# Altium PCB Custom_Keyboard.PcbDoc (part 2 of 3)
Units mil, origin at the board's own origin, x right, y up, seen from the top; angles counter-clockwise.
Board outline 3302 x 1991 mil, 2 copper layers (Top Layer, Bottom Layer), stack 57 mil thick; 188 components, 152 nets, 718 pads, 297 vias.
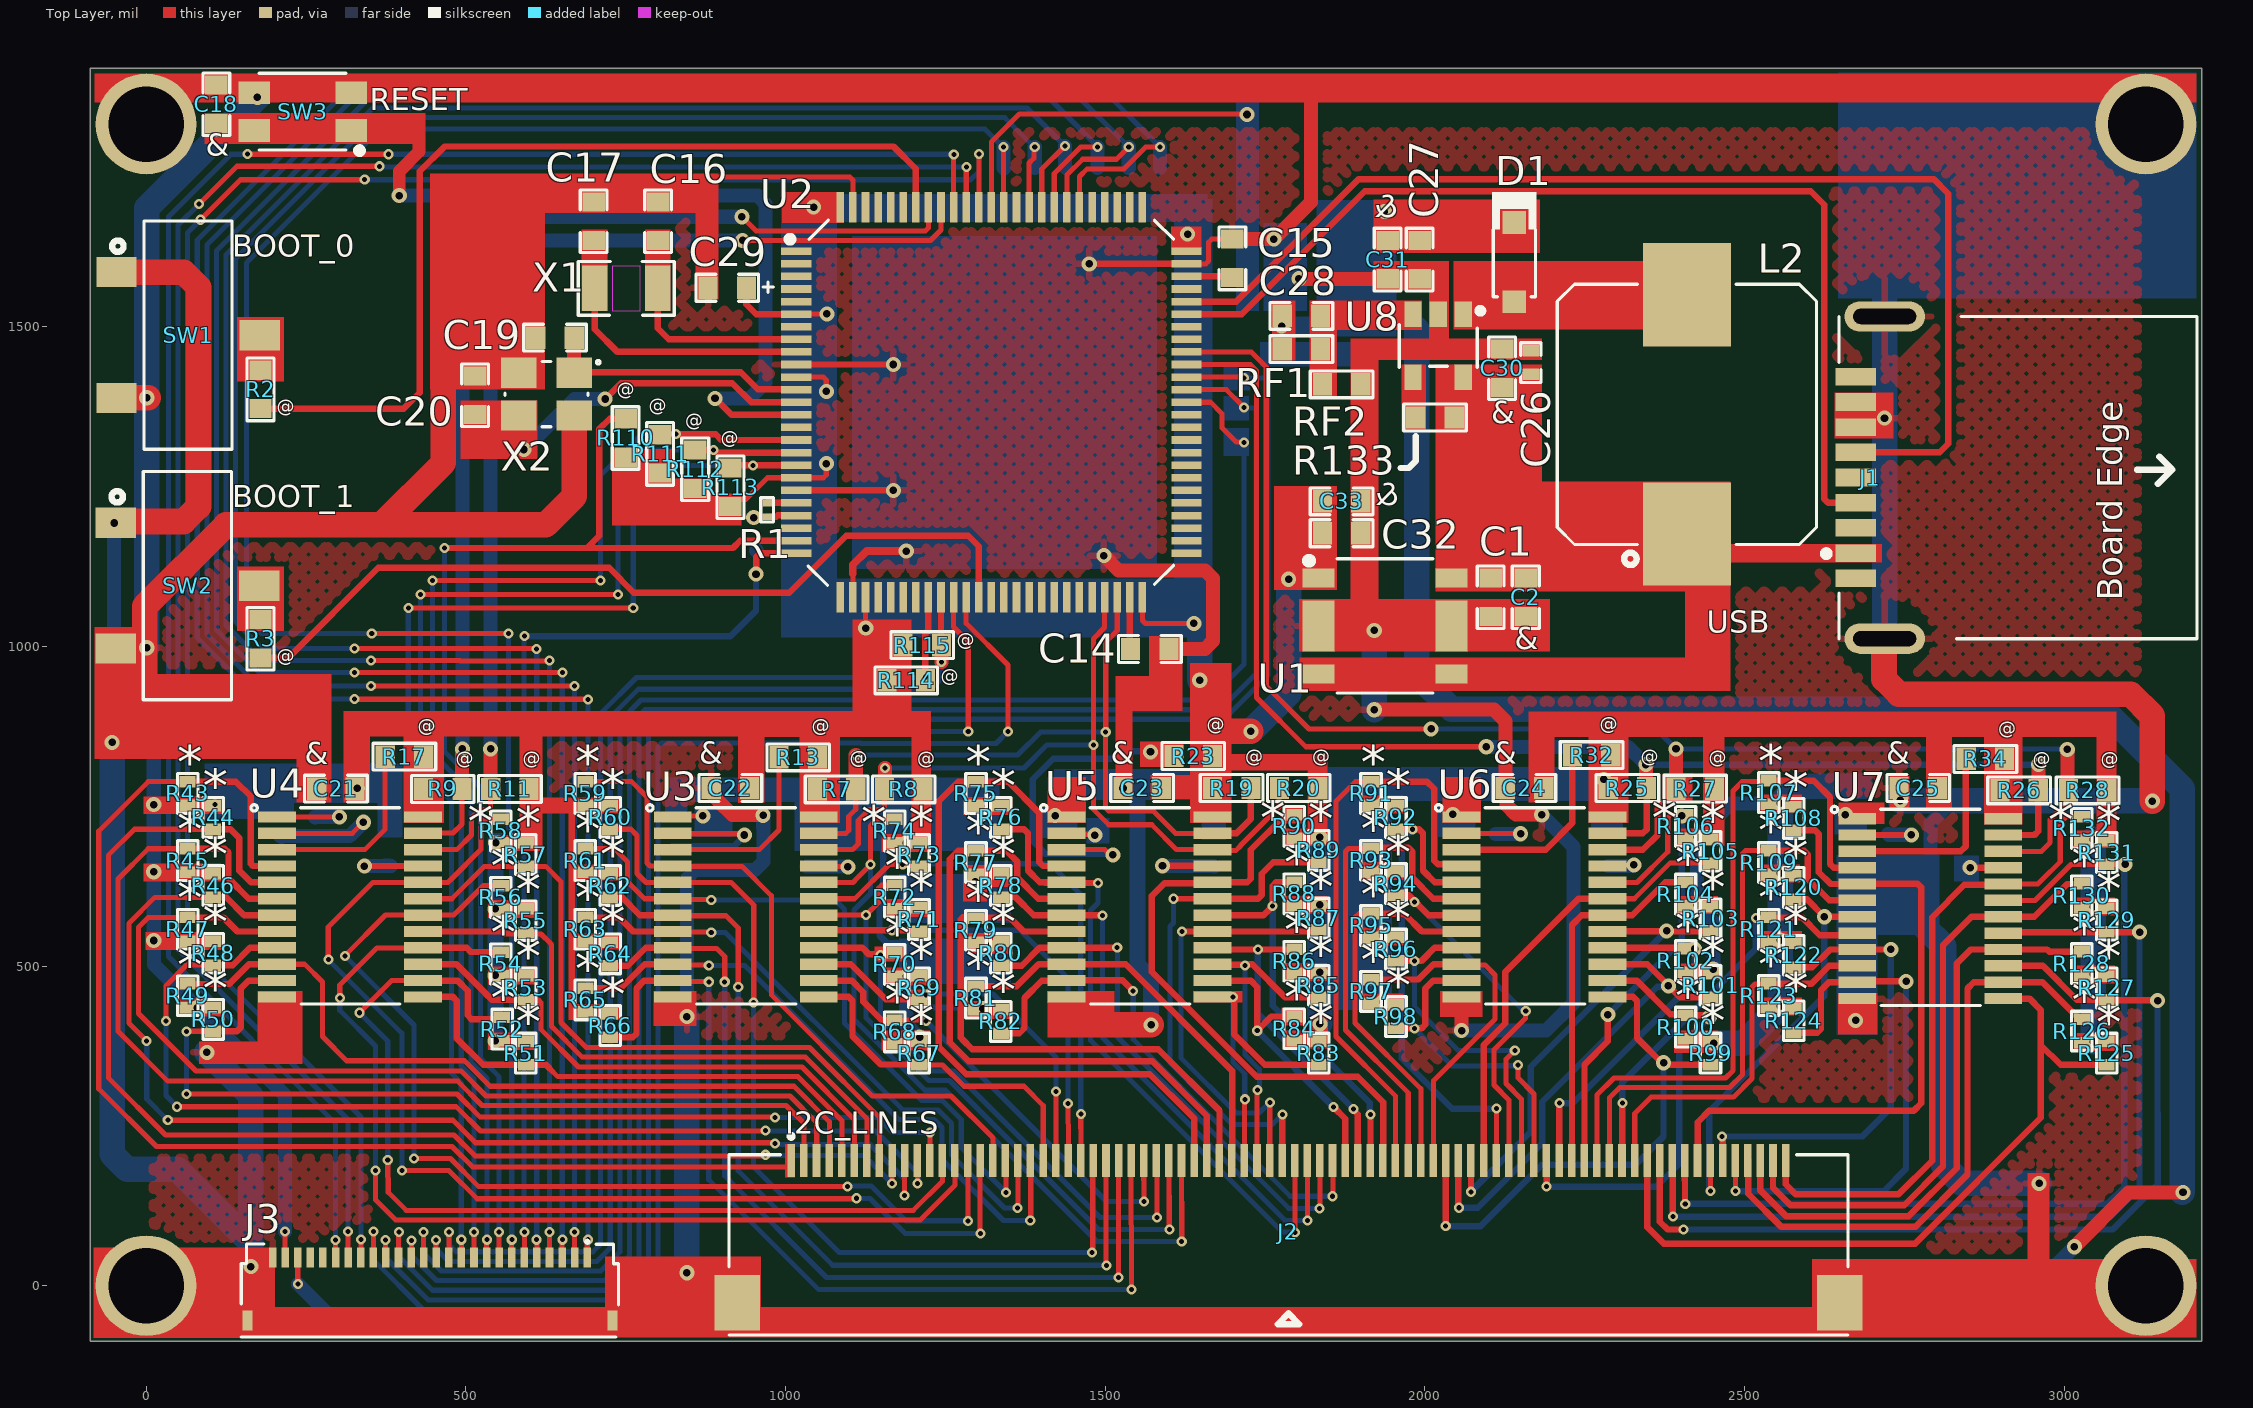
[diagram p0: Top Layer view]

## Part data (continued)
R133: library part RMCF0603FT51K0, "Res Thick Film 0603 51K Ohm 1% 0.1W(1/10W) ±100ppm/C Pad SMD Automotive T/R", Case Code (Imperial)=0603, Case Code (Metric)=1608, Manufacturer="Stackpole Electronics", Max Operating Temperature=155°C, Max Power Dissipation=100mW, Min Operating Temperature=-55°C, Resistance=51kR, Resistor Type="Thick Film", Supplier Part Number 1=RMCF0603FT51K0CT-ND, Temperature Coefficient=100ppm/°C, Tolerance=1%, Case/Package=0603, Category="Chip SMD Resistors", ComponentLink1Description=http://components.arrow.com/part/dataview/40961090S7167716N1174?src-supplier=Arrow+Electronics, ComponentLink1URL=http://components.arrow.com/part/dataview/40961090S7167716N1174?src-supplier=Arrow+Electronics, ComponentLink2Description=https://www.seielect.com/catalog/SEI-RMCF_RMCP.pdf?src-supplier=Avnet, ComponentLink2URL=https://www.seielect.com/catalog/SEI-RMCF_RMCP.pdf?src-supplier=Avnet, ComponentLink3Description=https://www.seielect.com/catalog/SEI-Packaging.pdf?src-supplier=Digi-Key, ComponentLink3URL=https://www.seielect.com/catalog/SEI-Packaging.pdf?src-supplier=Digi-Key, Contact Plating=Tin,Matte, Features="Automotive AEC-Q200", Height=0.022inch, Length=0.061inch, Manufacturer Part Number=RMCF0603FT51K0, Mount="Surface Mount", Number of Terminations=2, Packaging="Tape and Reel", Pricing 1="1=0.10000, 10=0.01700, 100=0.00680, 1000=0.00305, 2500=0.00264 (USD)", Radiation Hardening=No, RoHS=Yes, RoHS Compliant=Yes, Series=RMCF, Stock 1=628549, Supplier 1=Digi-Key, Width=0.031inch
RF1: library part RC0603FR-0768KL, "RES SMD 68K OHM 1% 1/10W 0603", Case Code (Imperial)=0603, Case Code (Metric)=1608, Manufacturer=Yageo, Max Operating Temperature=155°C, Max Power Dissipation=100mW, Min Operating Temperature=-55°C, Package Quantity=1, Resistance=68kR, Supplier Part Number 1=311-68.0KHRCT-ND, Temperature Coefficient=100ppm/°C, Tolerance=1%, Voltage Rating=50V, Case/Package=0603, ComponentLink1Description=http://www.yageo.com/documents/recent/PYu-RC_Group_51_RoHS_L_10.pdf?src-supplier=Digi-Key, ComponentLink1URL=http://www.yageo.com/documents/recent/PYu-RC_Group_51_RoHS_L_10.pdf?src-supplier=Digi-Key, ComponentLink2Description=http://documents.rs-components.com/techlib://itc_doclist_GB.htm?stockno=5048243&src-supplier=RSComponents, ComponentLink2URL=http://documents.rs-components.com/techlib://itc_doclist_GB.htm?stockno=5048243&src-supplier=RSComponents, ComponentLink3Description=http://www.yageo.com/documents/recent/PYu-RC_Group_51_RoHS_L_9.pdf?src-supplier=Digi-Key, ComponentLink3URL=http://www.yageo.com/documents/recent/PYu-RC_Group_51_RoHS_L_9.pdf?src-supplier=Digi-Key, ComponentLink4Description=http://www.farnell.com/datasheets/1868787.pdf?src-supplier=Element14, ComponentLink4URL=http://www.farnell.com/datasheets/1868787.pdf?src-supplier=Element14, ComponentLink5Description=http://www.farnell.com/datasheets/443971.pdf?src-supplier=Element14, ComponentLink5URL=http://www.farnell.com/datasheets/443971.pdf?src-supplier=Element14, ComponentLink6Description=http://www.farnell.com/datasheets/2167052.pdf?src-supplier=Element14, ComponentLink6URL=http://www.farnell.com/datasheets/2167052.pdf?src-supplier=Element14, Composition="Thick Film", Depth=0.8mm, Features="Moisture Resistant", Height=0.022inch, Lead Free="Lead Free", Length=0.063inch, Manufacturer Part Number=RC0603FR-0768KL, Number of Pins=2, Number of Terminations=2, Packaging="Tape and Reel", Power Rating=100mW, Pricing 1="1=0.1, 10=0.023, 100=0.0094, 1000=0.00421, 2500=0.00366 (USD)", REACH SVHC=Unknown, Stock 1=3330967, Supplier 1=Digi-Key, Termination=SMD/SMT, Voltage Rating (DC)=50V, Width=0.031inch
RF2: library part AC0603FR-0713K3L, "RES SMD 13.3K OHM 1% 1/10W 0603", Case/Package=0603, Manufacturer=Yageo, Max Operating Temperature=155°C, Max Power Dissipation=100mW, Min Operating Temperature=-55°C, Resistance=13.3kR, Resistor Type="Thick Film", Supplier Part Number 1=13-AC0603FR-0713K3LCT-ND, Temperature Coefficient=100ppm/°C, Tolerance=1%, Category="Chip SMD Resistors", ComponentLink1Description=http://www.yageo.com/NewPortal/yageodocoutput?fileName=/pdf/R-Chip/PYu-AC_51_RoHS_L_6.pdf&src-supplier=Digi-Key, ComponentLink1URL=http://www.yageo.com/NewPortal/yageodocoutput?fileName=/pdf/R-Chip/PYu-AC_51_RoHS_L_6.pdf&src-supplier=Digi-Key, Features="Moisture Resistant,Automotive AEC-Q200", Height=0.022inch, Length=0.063inch, Manufacturer Part Number=AC0603FR-0713K3L, Number of Terminations=2, Packaging="Tape and Reel", Pricing 1="1=0.10000, 10=0.02900, 100=0.01170, 1000=0.00527, 2500=0.00458 (USD)", RoHS=Yes, RoHS Compliant=Yes, Stock 1=500, Supplier 1=Digi-Key, Width=0.031inch
SW1 SW2: "SPDT 50mA @ 12VDC 12V On-On SMD Toggle Switches RoHS", Contact Rating @ Voltage="50mA @ 12VDC", Manufacturer="XKB Connectivity", Operating Force=200±100gf, Package=SMD, Rated Voltage(DC)=12V, Actuator Orientation=Vertical, Actuator Type=Standard, Circuit=SPDT, Contact Finish=Silver, Contact Material=Brass, Electrical Life Cycles=10000, Mounting Type="Surface Mount", Switch Height=3mm
SW3: "3mm 2mm Round Button 50mA Top3.65mm SPST 12V SMD Tactile Switches", Manufacturer=XKB, Package=Custom, ComponentLink1Description=LCSC, ComponentLink1URL=https://lcsc.com/product-detail/Tactile-Switches_XKB-Connectivity-TS-1185EC-C-D-B_C318893.html, Manufacturer Part No=TS-1185EC-C-D-B
U1: "IC REG LINEAR 3.3V 1A 6HSOP", Manufacturer=ABLIC, Supplier Part Number 1=1662-1407-1-ND, Category="Voltage Regulators - Linear", Manufacturer Part Number=S-1172B33-E6T1U, Pricing 1="1=1.61000, 10=1.43800, 25=1.36520, 100=1.12150, 250=1.04832, 500=0.92644, 1000=0.73140 (USD)", RoHS=Yes, RoHS Compliant=Yes, Stock 1=7813, Supplier 1=Digi-Key
U2: "IC MCU 32BIT 1MB FLASH 100LQFP", Case/Package=LQFP, Frequency=168MHz, Manufacturer=STMicroelectronics, Max Operating Temperature=105°C, Max Power Dissipation=465mW, Min Operating Temperature=-40°C, Category=Microcontrollers, ComponentLink1Description=https://datasheet.ciiva.com/48494/dm00037051-48494023.pdf?src-supplier=Avnet, ComponentLink1URL=https://datasheet.ciiva.com/48494/dm00037051-48494023.pdf?src-supplier=Avnet, Core Architecture=ARM, Data Bus Width=32b, Interface=I2C,SPI,USB,CAN,Ethernet,IrDA,UART,USART,LIN,EBI/EMI,I2S, Manufacturer Part Number=STM32F407VGT7TR, Max Frequency=168MHz, Memory Size=1MB, Memory Type=FLASH, Number of I/Os=82, Number of Pins=100, Number of Programmable I/O=82, Number of Timers/Counters=14, Oscillator Type=Internal, Packaging="Tape and Reel", Peripherals="Brown-out Detect/Reset,POR,PWM,WDT,DMA,LCD", Pricing 1="1000=8.54203, 2000=8.32301, 4000=8.19785, 6000=8.07269, 8000=7.97882, 10000=7.82238, 100000=7.69722 (USD)", Radiation Hardening=No, RAM Size=196KB, RoHS=Yes, RoHS Compliant=Yes, Supplier 1=Avnet, Supplier Part Number 1=STM32F407VGT7TR, Watchdog Timer=Yes
U3 U4 U5 U6 U7: "IC BUS SWITCH 1 X 8:1 24TSSOP", Case/Package=TSSOP, Manufacturer="Texas Instruments", Max Operating Temperature=85°C, Max Supply Current=80uA, Max Supply Voltage=5.5V, Min Operating Temperature=-40°C, Min Supply Voltage=1.65V, On-State Resistance=70R, Package Quantity=1, Supplier Part Number 1=296-34905-1-ND, Category="Decoders and Multiplexers", ComponentLink1Description=https://datasheet.ciiva.com/6614/tca9548a-6614721.pdf?src-supplier=Digi-Key, ComponentLink1URL=https://datasheet.ciiva.com/6614/tca9548a-6614721.pdf?src-supplier=Digi-Key, Contact Plating=Gold, Independent Circuits=1, Lead Free="Lead Free", Manufacturer Part Number=TCA9548APWR, Mount="Surface Mount", Number of Pins=24, Packaging="Tape and Reel", Pricing 1="1=2.09000, 10=1.87600, 25=1.77040, 100=1.50820, 250=1.41616, 500=1.23914, 1000=1.16900 (USD)", REACH SVHC="No SVHC", RoHS=Yes, Supplier 1=Digi-Key, Supply Type=Single
U8: "IC REG BOOST ADJ 0.8A SOT23-5", Case/Package=SOT-23-5, Manufacturer="TI National Semiconductor", Max Input Voltage=14V, Max Operating Temperature=125°C, Max Output Current=800mA, Max Output Voltage=28V, Min Input Voltage=2.7V, Min Operating Temperature=-40°C, Min Output Voltage=4V, Output Power=2.5W, Package Quantity=1, Quiescent Current=2.1mA, Supplier Part Number 1=926-LM27313XMF/NOPB, Switching Frequency=1.6MHz, Category="Voltage Regulators - Switching", ComponentLink1Description=https://datasheet.ciiva.com/22669/1775263-22669473.pdf?src-supplier=Element14, ComponentLink1URL=https://datasheet.ciiva.com/22669/1775263-22669473.pdf?src-supplier=Element14, ComponentLink2Description=https://datasheet.ciiva.com/27056/2038467-27056413.pdf?src-supplier=Jameco, ComponentLink2URL=https://datasheet.ciiva.com/27056/2038467-27056413.pdf?src-supplier=Jameco, ComponentLink3Description=https://datasheet.ciiva.com/23605/37176-23605316.pdf?src-supplier=Newark, ComponentLink3URL=https://datasheet.ciiva.com/23605/37176-23605316.pdf?src-supplier=Newark, ComponentLink4Description=https://datasheet.ciiva.com/25627/0900766b810fa43d-25627220.pdf?src-supplier=RSComponents, ComponentLink4URL=https://datasheet.ciiva.com/25627/0900766b810fa43d-25627220.pdf?src-supplier=RSComponents, ComponentLink5Description=https://datasheet.ciiva.com/15113/getdatasheetpartid-203533-15113382.pdf?src-supplier=Verical, ComponentLink5URL=https://datasheet.ciiva.com/15113/getdatasheetpartid-203533-15113382.pdf?src-supplier=Verical, ComponentLink6Description=https://datasheet.ciiva.com/3220/lm27313-q1-3220064.pdf?src-supplier=Avnet, ComponentLink6URL=https://datasheet.ciiva.com/3220/lm27313-q1-3220064.pdf?src-supplier=Avnet, ComponentLink7Description=https://datasheet.ciiva.com/6603/lm27313-6603792.pdf?src-supplier=Digi-Key, ComponentLink7URL=https://datasheet.ciiva.com/6603/lm27313-6603792.pdf?src-supplier=Digi-Key, ComponentLink8Description=https://datasheet.ciiva.com/6603/lm27313-6603791.pdf?src-supplier=Digi-Key, ComponentLink8URL=https://datasheet.ciiva.com/6603/lm27313-6603791.pdf?src-supplier=Digi-Key, ComponentLink9Description=https://datasheet.ciiva.com/6603/lm27313-6603788.pdf?src-supplier=Digi-Key, ComponentLink9URL=https://datasheet.ciiva.com/6603/lm27313-6603788.pdf?src-supplier=Digi-Key, Contact Plating=Tin, Efficiency=80%, Height=1.02mm, Lead Free="Lead Free", Length=2.92mm, Manufacturer Part Number=LM27313XMF/NOPB, Mount="Surface Mount", Number of Outputs=1, Number of Pins=5, Output Configuration=Positive, Output Current=800mA, Output Type=Adjustable, Output Voltage=28V, Packaging="Tape and Reel", Pricing 1="1=2.17000, 10=1.96000, 25=1.85000, 50=1.85000, 100=1.58000, 250=1.48000, 500=1.30000, 1000=1.07000, 10000=1.07000 (USD)", Radiation Hardening=No, REACH SVHC="No SVHC", RoHS=Yes, RoHS Compliant=Yes, Series=LM27313, Supplier 1=Mouser, Synchronous Rectifier=No, Topology=Boost, Width=1.6mm
X1: library part Q13FC1350000200, "32.768kHz SMD Crystal Resonator 7pF 70kΩ ±20ppm", Equivalent Series Resistance (ESR)=70kΩ, Frequency=32.768kHz, Load Capacitance=7pF, Manufacturer="Seiko Epson", Crystal Type="SMD Crystal Resonator"
X2: library part S3225000101040, "25MHz SMD Crystal Resonator 10pF 40Ω ±10ppm", Equivalent Series Resistance (ESR)=40Ω, Load Capacitance=10pF, Manufacturer=JGHC, Crystal Type="SMD Crystal Resonator", Frequency=25MHz

## Free pads (board coordinates)
  round 157.48 hole 118.11: MH1(0,0) MH2(3128,0) MH3(3128,1817) MH4(0,1817)

## Via types
v1: diameter 15.75, hole 7.87, Top Layer to Bottom Layer, tented both sides, 170 vias
v2: diameter 23.62, hole 11.81, Top Layer to Bottom Layer, tented both sides, 127 vias

## Nets (pads, with @x,y where several pads share a name; then routed paths per layer and width w, separated by ;. In a path a pad name is that pad's centre, name@x,y a point inside that pad or via, vN(x,y) a via of type N, cw(c..) or ccw(c..) an arc to the next point about the centre after c; other vN are vias at no path point)
BOOT0: R2.1 U2.94 | length 1472
  Top Layer w10: R2.1@179,1372 403,1372 428,1397 428,1743 467,1782 1169,1782 1204,1747 U2.94@1204,1687
BOOT1: R3.1 U2.37 | length 1321.2
  Top Layer w10: R3.1@179,982 222.14,982 363.02,1122.87 724.23,1122.87 762.92,1084.19 1006.19,1084.19 1095,1173 1286,1173 1302.43,1156.57 U2.37@1302.43,1076.76
COl_1: J3.1 R6.1 U2.81 | length 4026.7
  Top Layer w8: v1(326,918) 326.57,917.43 690.43,917.43 v1(691,916.85) ; J3.1@689.96,44.11 689.96,70.96 v1(691,72) ; U2.81@1459.91,1687 1459.91,1734.91 1472,1747 1529.69,1747 1563.69,1781 v1(1586,1781)
  Bottom Layer w8: v1(326,918) 175,918 80,1013 80,1635.56 331.44,1887 1480,1887 v1(1586,1781) ; v1(691,72) v1(691,916.85)
  Bottom Layer w22: R6.1@1586,1748 v1(1586,1781)
COl_2: J3.2 R37.1 U2.82 | length 3891.5
  Top Layer w8: v1(352,938) 668.39,938 669.39,937 v1(670.39,938) ; J3.2@670.39,44 v1(670.39,84.13) ; U2.82@1440.22,1687 1440.22,1737.22 1465,1762 1518,1762 v1(1537,1781)
  Bottom Layer w8: v1(352,938) 176.21,938 95,1019.21 95,1628 339,1872 1446,1872 v1(1537,1781) ; v1(670.39,84.13) v1(670.39,938)
  Bottom Layer w22: R37.1@1537,1748 v1(1537,1781)
COl_3: J3.3 R38.1 U2.83 | length 3756.9
  Top Layer w8: v1(326,959) 649,959 650.5,957.5 v1@651,958 ; J3.3@650.59,44.11 650.59,71.59 v1(651,72) ; U2.83@1420.54,1687 1420.54,1739.54 1462,1781 v1(1488,1781)
  Bottom Layer w8: v1(326,959) 177,959 110,1026 110,1619 348,1857 1413,1857 v1@1489,1781 ; v1(651,72) v1(651,959)
  Bottom Layer w22: R38.1@1488,1748 v1(1488,1781)
COl_4: J3.4 R39.1 U2.84 | length 3621.5
  Top Layer w8: v1(352,978) 491.06,978 491.81,977.25 628.63,977.25 v1@629.37,978 ; J3.4@631.02,44 v1(631.02,84.13) ; U2.84@1400.9,1685.28 1400.9,1746.59 v1(1437.15,1782.85)
  Bottom Layer w8: v1(352,978) 179.57,978 125,1032.57 125,1612.64 354.36,1842 1378,1842 v1(1437.15,1782.85) ; v1(631.02,84.13) v1@631.01,978
  Bottom Layer w22: v1(1437.15,1782.85) 1437.15,1749.85 R39.1@1439,1748
  other v1: 630.87,978
COl_5: J3.5 R40.1 U2.85 | length 3498.9
  Top Layer w8: v1(326,997) 326.13,996.87 610.25,996.87 v1(611,996.13) ; v1(611,72) 611.22,71.78 J3.5@611.22,44.11 ; U2.85@1381.17,1687 1381.17,1756.13 1388.52,1763.48 1388.52,1778.52 v1@1390,1780
  Bottom Layer w8: v1(326,997) 181.79,997 140,1038.79 140,1606.43 360.57,1827 1343,1827 v1@1390,1780 ; v1(611,72) v1(611,996.13)
  Bottom Layer w22: R40.1@1390,1748 v1(1390,1781)
COl_6: J3.6 R41.1 U2.25 | length 1540.6
  Top Layer w8: v1@589,1016 590,1017 v1@591,1016 ; J3.6@591.65,44 v1(591.65,84.13)
  Top Layer w10: v2@954.14,1113.14 954.14,1139.8 960,1145.66 U2.25@1016.99,1145.66
  Bottom Layer w8: v1@591.32,1015.68 591.32,84.45 v1(591.65,84.13)
  Bottom Layer w10: v1(592,1016) 914,1016 954,1056 v2(954,1113) ; v2@954.31,1113.31 R41.1@954.31,1150.31
  Bottom Layer w22: v2(954,1113) v2@954.31,1113.31 ; R41.1@954.31,1150.31 R41.1@955,1151
COl_7: J3.7 R42.1 U2.87 | length 3365.7
  Top Layer w8: v1(353,1020) v1(567,1020) ; J3.7@571.85,44.11 571.85,71.85 v1(572,72) ; v1(1341,1781) 1341.4,1780.6 1341.4,1687.4 U2.87@1341.8,1687
  Bottom Layer w8: v1(353,1020) 180,1020 157,1043 157,1600 366,1809 1312.31,1809 1340.31,1781 v1(1341,1781) ; v1(567,1020) 567,715.56 572,710.56 v1(572,72) ; R42.1@1341,1747 R42.1@1341.8,1747.8
  Bottom Layer w22: v1(1341,1781) 1341,1748.59 R42.1@1341.8,1747.8
COl_8: J3.8 R110.1 U2.24 | length 1947.8
  Top Layer w8: J3.8@552.28,44 v1(552.28,84.13)
  Top Layer w10: v1(467,1154) 690,1154 ; R110.1@750,1356 725,1356 709,1340 709,1173 690,1154 ; R110.1@761,1354 761,1358.19 R110.1@762.5,1359.69 ; U2.24@1016.99,1165.35 929.35,1165.35 918,1154 690,1154
  Bottom Layer w8: v1(467,1154) 467,835.21 523,779.21 523,356 552.28,326.72 v1(552.28,84.13)
COl_9: J3.9 R111.1 U2.16 | length 1873.4
  Top Layer w8: v1(448,1103) v1(711,1103) ; J3.9@532.48,44.11 532.48,71.48 v1(533,72)
  Top Layer w10: R111.1@814,1332 v1(829,1332) 890.94,1332 900.11,1322.83 U2.16@1016.99,1322.83
  Bottom Layer w8: v1(448,1103) 448,833 508,773 508,349.79 533,324.79 v1(533,72) ; v1(711,1103) 711,1267.61 775.39,1332 v1(829,1332)
COl_10: J3.10 R112.1 U2.17 | length 1888.3
  Top Layer w8: v1(429,1081) v1(738,1081) ; J3.10@512.91,44 v1(512.91,84.13)
  Top Layer w10: R112.1@864,1307 v1(887.83,1307) 889.39,1307 893.25,1303.14 U2.17@1016.99,1303.14
  Bottom Layer w8: v1(429,1081) 429,828 493,764 493,343.57 512.91,323.67 v1(512.91,84.13) ; v1(738,1081) 738,1268 777,1307 v1(887.83,1307)
COl_11: J3.11 R113.1 U2.18 | length 1904.8
  Top Layer w8: v1(410.13,1060) v1(762,1060) ; v1(493,72) 493.11,71.89 493.11,44.11 J3.11@493.22,44
  Top Layer w10: R113.1@914,1279 918.46,1283.46 U2.18@1016.99,1283.46
  Bottom Layer w8: 410.13,824.87 v1(410.13,1060) v1@411,1059.13 ; 411,824 478,757 478,332 493,317 v1(493,72) ; v1(762,1060) 762,1262 783,1283 v1(949,1283)
COl_12: J3.12 R114.1 U2.33 | length 1794.9
  Top Layer w8: J3.12@473.54,44 v1(473.54,84.13)
  Top Layer w10: R114.1@1219,956.87 1219,1020.81 1223.69,1025.5 U2.33@1223.69,1076.76
  Top Layer w22: R114.1@1219,947 v1(1219,951.87)
  Bottom Layer w8: v1(473.54,84.13) 474.13,83.54 474.13,64.18 485.18,53.13 698.82,53.13 711,65.31 711,895.28 767.16,951.44 1218.56,951.44 v1(1219,951.87)
COl_13: J3.13 R115.1 U2.34 | length 1831.3
  Top Layer w8: v1(453.43,71.57) 453.43,44.43 J3.13@453.85,44
  Top Layer w10: U2.34@1243.37,1076.76 1243.37,1002.63 R115.1@1244,1002
  Top Layer w22: R115.1@1244,1002 1244.09,1001.91 v1(1244.09,975.43)
  Bottom Layer w8: v1(453.43,71.57) 453.43,58 473.3,38.13 705.03,38.13 726,59.09 726,889.07 769.93,933 1227.25,933 1244.09,949.83 v1(1244.09,975.43)
COl_14: J3.14 R116.1 U2.63 | length 2722.7
  Top Layer w8: J3.14@434.17,44 v1(434.17,84.13) ; U2.63@1627.23,1381.88 1665.12,1381.88 1683,1364 1683,1342 1705.51,1319.49 1716.64,1319.49 v1(1717.13,1319)
  Bottom Layer w8: v1(434.17,84.13) 434.17,50.83 461.87,23.13 711.24,23.13 741,52.88 741,882.85 774.15,916 1660.84,916 1717.13,972.29 v1(1717.13,1319)
COl_15: J3.15 R117.1 U2.64 | length 2801.9
  Top Layer w8: J3.15@414.19,44.3 415,45.11 v1(415,71) ; J3.15@414.48,44 J3.15@414.74,43.74 ; U2.64@1627.23,1401.57 1689.56,1401.57 v1(1717.13,1374) v1@1717.13,1375.87
  Bottom Layer w8: v1(415,71) 415,47.21 454.09,8.13 717.46,8.13 756,46.67 756,876.64 780.36,901 1679.79,901 1736,957.21 1736,1369.31 1732.31,1373 1720,1373 v1@1719,1374
COl_16: J3.16 R118.1 U2.65 | length 2961.8
  Top Layer w8: J3.16@394.8,44 395.06,44.27 395.06,83.86 v1(395.33,84.13) ; U2.65@1627.23,1421.25 1716.25,1421.25 v1@1717.5,1420
  Bottom Layer w8: v1(395.33,84.13) 395.33,45.67 448,-7 725,-7 771,39 771,870.43 786.57,886 1686,886 1755,955 1755,1415.31 1750.31,1420 1717.5,1420 R118.1@1692,1420
  other v1: 1717.13,1420
DM: J1.2 U2.70 | length 1598
  Top Layer w10: U2.70@1627.23,1519.68 1714,1519.68 1906.33,1712 2604,1712 2625,1691 2625,1230.6 2630.86,1224.74 J1.2@2674,1224.74
DP: J1.3 U2.71 | length 1817.2
  Top Layer w10: U2.71@1627.23,1539.36 1705.18,1539.36 1896.81,1731 2796,1731 2818.86,1708.14 2818.86,1316.86 2805.48,1303.48 J1.3@2679,1303.48
FB: C28.1 RF1.2 RF2.2 U8.3
GND: C1.2 C2.2 C3.2 C4.2 C5.2 C6.2 C7.2 C8.2 C9.2 C10.2 C11.2 C12.2 C13.2 C14.2 C15.2 C16.1 C17.1 C18.2 C19.1 C20.1 C21.2 C22.2 C23.2 C24.2 C25.2 C26.2 C27.2 C29.2 C30.2 C31.2 C32.2 C33.2 J1.4 J1.6 J1.MH1 J1.MH2 J2.MP1 J2.MP2 J3.26 J3.MP1 J3.MP2 pad.MH1 pad.MH2 pad.MH3 pad.MH4 Q2.2 R5.1 R21.2 R22.2 R24.2 R33.2 R36.2 RF2.1 SW1.3 SW2.3 SW3.2 U1.2 U1.5 U2.10 U2.20 U2.27 U2.74 U2.99 U3.12 U4.12 U5.12 U6.12 U7.12 U8.2 X2.2 X2.4 | length 10464.4
  Top Layer w8: 669.5,1709 694.5,1734 1100.89,1734 1105.57,1729.31 U2.99@1105.57,1687 ; U2.27@1105.57,1076.76 1105.57,1114 ; U2.74@1629.13,1600.32 U2.74@1627.23,1598.42 1657.42,1598.42 1662,1603 1662,1632.31 1666.69,1637 C15.2@1699,1637
  Top Layer w10: U2.20@1016.99,1244.09 v2(1168.91,1244.09) ; U2.10@1016.99,1440.94 v2(1168.91,1440.94) ; v2(1475.31,1598.42) U2.74@1627.23,1598.42
  Top Layer w12: 1105.57,1114 1105.57,1127.57 1127.19,1149.19 v2(1189,1149.19)
  Top Layer w22: C22.2@884,776.5 888,772.5 888,765.11 896,757.11 917.09,736 v2(965,736) ; v2(1498,1142) 1521,1119 1656.11,1119 1669,1106.11 1669,1008.89 1656.11,996 C14.2@1600,996 ; C15.2@1699,1637 v2(1764,1637) 1822,1695 1822,1859 ; v2(1803,1575) C31.2@1942,1575 ; v2(1921,901) 2108,901 2126,883 2126,777 2128,775 2128,751.89 2142.39,737.5 2182.19,737.5 v2(2183,736.69) ; v2(2057.65,399.17) 2058,442 ; C25.2@2742,772 2744,770 v2(2744,759)
  Top Layer w40: SW2.3@-46.41,998.57 SW2.3@-43.83,996 ; SW1.3@-46.41,1388.57 SW1.3@-43.98,1391 ; SW1.3@-44.98,1389 v2@3,1389 ; -11,972 -2,981 -2,1063 125,1190 368,1190 ; 538.5,1544.5 538.5,1517.5 465,1444 465,1287 368,1190 ; X2.4@669.61,1361 669.61,1234.61 625,1190 368,1190 ; 1437,408 v2(1572,408) ; J1.MH1@2718.28,1011.03 2718.28,948.93 2741.71,925.5 3104.07,925.5 3138,891.57 v2(3138,758)
  Bottom Layer w22: v2(846,421) 846,637.11 858.89,650 952.11,650 965.62,663.51 965.62,717.35 965.31,717.66 965.31,735.69 v2(965,736) ; v2@2053.65,399.17 2053.81,399 2189.66,399 2233,442.34 2233,686.25 2183,736.25 v2(2183,736.69) ; R36.2@2791,660 2791,724 2825.69,758.69
  Bottom Layer w25: 1551,772 1551,502 1572,481 v2(1572,408)
  Bottom Layer w40: v2(-53,850) -53,205.43 -29.57,182 49,182 164,67 ; v2@1,1387 1,998 v2(1.05,997.95) ; v2@1,1391 1,1685.77 v2(174.23,1859) ; v2(95.13,365.13) 95.87,365.13 164,297 164,67 ; v2(164,30) 164,67 ; v2(846,20.35) v2(846,421) ; v2(1921,901) v2(1921,1025) ; 2703,1573 2710.4,1573 2719.4,1564 2719.4,1511.97 2719.4,1011.38 2719.06,1011.03 2713.31,1011.03 J1.MH1@2713,1011.35 ; J1.MH2@2713,1514.65 2713.31,1514.97 J1.MH2@2714.5,1514.97 ; v2(2744,759) 2744.31,758.69 2825.69,758.69 3137.31,758.69 v2(3138,758) ; 2780.96,562.04 2812,531 2812,188 2840,160 v2(2961,160)
  other v2: 2674,415 1528,778.5 2719.06,1357 1.05,1389
I2C1_SCL: R11.2 U2.92 U4.22 | length 1763.9
  Top Layer w8: U4.22@433.17,682.07 486.07,682.07 509,705 509,731.53 522.47,745 534.31,745 539,749.69 R11.2@539,777 ; v2(933,1635) 1227,1635 1243.37,1651.37 U2.92@1243.37,1687
  Top Layer w22: R11.2@539,777 v2(539,839.74)
  Bottom Layer w22: v2(539,839.74) 539,1605 569,1635 v2(933,1635)
I2C1_SDA: R9.2 U2.93 U4.23 | length 1758
  Top Layer w8: U4.23@433.17,707.66 433.52,708 480,708 494,722 R9.2@494,777 ; v2(932,1672) 954,1650 1219,1650 1223.69,1654.69 U2.93@1223.69,1687
  Top Layer w22: R9.2@494,777 494,839 v2(494.74,839.74)
  Bottom Layer w22: v2@495,840 v2(494.74,839.74) 494.74,1617.74 549,1672 v2(932,1672)
I2C2_SCL: R8.2 R20.2 U2.47 U3.22 U5.22 | length 1268.5
  Top Layer w8: U3.22@1052.17,682.07 1105.07,682.07 1114,691 1114,728 1131,745 1150,745 1155,750 R8.2@1155,776.5 ; v1@1481.61,846.1 1481.61,1011.74 1499.28,1029.41 U2.47@1499.28,1076.76 ; v1@1481.8,845.9 1481.61,845.71 1481.61,745.21 1505.82,721 1572.96,721 1611.89,682.07 U5.22@1668.17,682.07 1669.23,681.01 1705.01,681.01 1712,688 1712,688.63 1772,748.63 1772,777.5 R20.2@1773,778.5
  Top Layer w22: R8.2@1155,776.5 R8.2@1156.83,778.33 ; R8.2@1155.83,778.33 1155.83,809.83 v1(1156,810)
  Bottom Layer w8: v1(1156,810) 1373,810 1409.1,846.1 1481.51,846.1 v1(1481.61,846)
I2C2_SDA: R7.2 R19.2 U2.48 U3.23 U5.23 | length 1215.4
  Top Layer w8: U3.23@1052.17,707.66 1094.31,707.66 1099,712.34 1099,734.21 1110,745.21 R7.2@1110,776.5 ; U2.48@1518.96,1076.76 1518.96,1025.05 1501,1007.09 v1(1501,865.87) 1500.48,865.36 1500.48,747.69 1505.17,743 1575,743 1610.34,707.66 U5.23@1668.17,707.66
  Top Layer w10: U5.23@1668.17,707.66 1705.66,707.66 1728,730 R19.2@1728,778.5
  Top Layer w22: R7.2@1110,776.5 v1(1110,830)
  Bottom Layer w8: v1(1110,830) 1363,830 1398.87,865.87 v1(1501,865.87)
I2C3_SCL: R27.2 R28.2 U2.67 U6.22 U7.22 | length 2399.4
  Top Layer w8: U2.67@1627.23,1460.62 1728.59,1460.62 1752,1437.21 1752,938 1819,871 v2(2010,871) ; U7.22@2905,679.5 2964.5,679.5 2978,693 2978,729 3004,755 R28.2@3004,771.59
  Top Layer w10: U6.22@2286,682.07 2341.2,682.07 2364,704.86 2364,746 2393,775 R27.2@2393,777.5 ; R28.2@3004,771.59 3007,774.59 R28.2@3006.65,774.93
  Top Layer w22: R27.2@2393,777.5 v2(2393,839.69) ; v2(3005,839) 3005.31,838.69 3005.31,776.28 R28.2@3006.65,774.93
  Bottom Layer w8: v2(2010,871) 2361.69,871 v2(2393,839.69) 3004.31,839.69 v2(3005,839)
I2C3_SDA: R25.2 R26.2 U2.66 U6.23 U7.23 | length 2214
  Top Layer w8: U2.66@1627.23,1440.94 1727.06,1440.94 1737,1431 1737,920 1814,843 v2(2096.19,843)
  Top Layer w10: U6.23@2286,707.66 2341.14,707.66 2347,713.52 R25.2@2347,778.5 ; U7.23@2905,705.09 2953.8,705.09 2959.65,710.95 R26.2@2959.65,774.93
  Top Layer w22: v2@2346,813 2346,779.5 R25.2@2347,778.5 ; R26.2@2959.65,774.93 2959.65,814.65 v2(2960,815)
  Bottom Layer w10: v2@2348,815 v2(2960,815)
  Bottom Layer w22: v2(2096.19,843) 2318,843 v2(2346,815)
MUX_1.SCL_1: J2.9 R44.1 U4.5 | length 2008.8
  Top Layer w8: R44.1@105,714 -18.21,714 -59,673.21 -59,325.21 30.21,236 481.64,236 514.77,202.87 966.9,202.87 v1(968.9,204.87) ; v1(1166.76,159.86) J2.9@1166.76,179.76
  Top Layer w10: R44.1@105,714 132,714 146,700 146,649.04 164.16,630.89 U4.5@204.83,630.89
  Bottom Layer w8: v1(968.9,204.87) 969.9,203.87 1122.75,203.87 v1(1166.76,159.86)
MUX_1.SCL_2: J2.10 R46.1 U4.7 | length 1865.5
  Top Layer w8: v1(1,383) -27,411 -27,566.77 13.73,607.5 R46.1@105,607.5 ; v1(33.95,258.95) 479.9,258.95 515.1,223.75 983,223.75 v1(984,222.75) ; v1(1186.15,140.85) 1186.15,194.75 J2.10@1187.41,196.01
  Top Layer w10: R46.1@105,607.5 125.5,607.5 153.3,579.7 U4.7@204.83,579.7
  Bottom Layer w8: v1(1,383) 1,291.9 v1(33.95,258.95) ; v1(984,222.75) 985.25,222.75 987,221 1132.32,221 1186.15,167.17 v1(1186.15,140.85)
MUX_1.SCL_3: J2.11 R48.1 U4.9 | length 1646.6
  Top Layer w8: v1(31,414) 31,469.4 63.1,501.5 R48.1@105,501.5 ; v1(48.48,280) 485,280 523,242 968.28,242 v1(968.9,242.62) ; J2.11@1206.5,187 1206.87,186.62 v1(1206.87,159.86) v1@1206.87,156.96
  Top Layer w10: R48.1@105,501.5 135.5,501.5 162.52,528.52 U4.9@204.83,528.52
  Bottom Layer w8: v1(31,414) 31,297.48 v1(48.48,280) ; v1(968.9,242.62) 969.53,242 1140.77,242 1208.39,174.38 v1@1208.39,157.15
MUX_1.SCL_4: J2.12 R50.1 U4.11 | length 1513.4
  Top Layer w8: v1(63.35,300) 486.36,300 522.62,263.74 983.26,263.74 v1(984,263) ; v1@63.35,302 v1@64.84,300.52 ; v1@67.35,398 R50.1@105,398 ; J2.12@1226.18,220.44 v1(1226.18,239.82)
  Top Layer w10: R50.1@105,398 142.14,398 148,403.86 148,465 160.34,477.34 U4.11@204.83,477.34
  Bottom Layer w8: v1(63.35,300) v1(63.35,398) ; v1(984,263) 1144.04,263 1167.22,239.82 v1(1226.18,239.82)
MUX_1.SCL_5: J2.13 R52.1 U4.14 | length 1519.4
  Top Layer w8: v1(334,427) 384.34,477.34 U4.14@433.17,477.34 ; v1(378,197) 378.07,192 378.72,146.28 407,118 1200,118 1245.5,163.5 J2.13@1245.5,196.01
  Top Layer w10: U4.14@433.17,477.34 487.15,477.34 502.93,461.57 502.93,422.86 508.79,417 552.5,417 R52.1@555,419.5
  Bottom Layer w8: v1(334,427) 378,383 v1(378,197)
MUX_1.SCL_6: J2.14 R54.1 U4.16 | length 1618.4
  Top Layer w8: v1@303,450.35 303,470.21 361.31,528.52 U4.16@433.17,528.52 ; v1(359,180) 359,134.34 390.34,103 1210.86,103 1265.55,157.69 J2.14@1265.19,196.01
  Top Layer w10: U4.16@433.17,528.52 501.48,528.52 508,522 R54.1@555,522
  Bottom Layer w8: v1@303,450.35 303,431 359,375 v1(359,180)
  other v1: 303,450
MUX_1.SCL_7: J2.15 R56.1 U4.18 | length 1650
  Top Layer w8: v1(310.85,516) 374.55,579.7 U4.18@433.17,579.7 481.39,579.7 495.78,594.09 527.69,626 R56.1@551.33,626 ; v1(419,198.87) 476.34,198.87 520.21,155 v1(1097,155) ; J2.15@1285.24,196.01 1285.62,195.63 v1(1285.62,101.62)
  Bottom Layer w8: v1(310.85,516) 419,407.85 v1(419,198.87) ; v1(1097,155) 1097.75,155.75 1134.47,155.75 1188.6,101.62 v1(1285.62,101.62)
MUX_1.SCL_8: J2.16 R58.1 U4.20 | length 1853.2
  Top Layer w8: v1(285,510) 285,561 354.94,630.94 U4.20@433.17,630.89 472.31,630.94 477,635.63 524,682.63 524,725.31 528.69,730 R58.1@555,730 ; v1(400,180) 474,180 517.87,136.13 1110.75,136.13 v1(1111.49,136.87) ; v1@1304.56,81.54 J2.16@1304.56,196.01
  Bottom Layer w8: v1(285,510) 400,395 400,182.58 v1@400.58,182 ; v1(1111.49,136.87) 1111.87,136.49 1132.51,136.49 1187.46,81.54 v1(1305.46,81.54)
MUX_1.SDA_1: J2.1 R43.1 U4.4 | length 1973.7
  Top Layer w8: R43.1@65,788.5 3.44,788.5 -74,711.06 -74,308 16.25,217.75 478.68,217.75 510.43,186 1007.38,186 1009.28,187.91 J2.1@1009.28,196.01
  Top Layer w10: R43.1@65,788.5 140.5,788.5 163.59,765.41 163.59,660.33 167.34,656.58 U4.4@202.72,656.58 ; U4.4@202.72,658.58 U4.4@204.83,656.48
MUX_1.SDA_2: J2.2 R45.1 U4.6 | length 1729
  Top Layer w8: R45.1@65,683.5 3.44,683.5 -44,636.06 -44,398 34,320 487.57,320 525.57,282 1000.93,282 1029.33,253.6 J2.2@1029.33,220.44
  Top Layer w10: R45.1@65,683.5 123.14,683.5 129,677.64 129,637 160.7,605.3 U4.6@204.83,605.3
MUX_1.SDA_3: J2.3 R47.1 U4.8 | length 1533.3
  Top Layer w8: R47.1@65,576 3.44,576 -12,560.56 -12,426 71,343 78,336 492.79,336 531.79,297 1007.15,297 1049.02,255.13 J2.3@1049.02,220.44
  Top Layer w10: R47.1@65,576 121,576 142.89,554.11 U4.8@204.83,554.11
MUX_1.SDA_4: J2.4 R49.1 U4.10 | length 1204.7
  Top Layer w8: U4.10@193,502.93 U4.10@204.83,502.93 248.07,502.93 276,475 276,389.69 313.69,352 498,352 538,312 1013.36,312 1068.7,256.66 J2.4@1068.7,220.44
  Top Layer w10: R49.1@65,472 130.04,472 160.97,502.93 U4.10@193,502.93
MUX_1.SDA_5: J2.5 R51.1 U4.13 | length 807.8
  Top Layer w8: 631.01,339.99 644,327 1019.57,327 1088.39,258.19 J2.5@1088.39,220.44
  Top Layer w10: U4.13@433.17,451.75 480.07,451.75 485.93,445.89 485.93,386.7 527.19,345.43 R51.1@594,345.43 625.57,345.43 631.01,339.99
MUX_1.SDA_6: J2.6 R53.1 U4.15 | length 840
  Top Layer w8: R53.1@594,447.5 594.5,447 613.81,447 618,442.81 618,400.52 676.52,342 1025.79,342 1108.07,259.72 J2.6@1108.07,220.44
  Top Layer w10: U4.15@433.17,502.93 485.6,502.93 531.02,457.52 531.02,457.03 540.54,447.5 R53.1@594,447.5
MUX_1.SDA_7: J2.7 R55.1 U4.17 | length 933.1
  Top Layer w8: R55.1@593.5,551 595,552.5 597.31,550.19 617.81,550.19 634,534 634,405.73 682.23,357.5 1031.5,357.5 1127.76,261.24 J2.7@1127.76,220.44
  Top Layer w10: U4.17@433.17,554.11 557.89,554.11 561,551 R55.1@593.5,551